# Altium PCB 新执行器202608.PcbDoc (part 1 of 2)
Units mm, origin at the board's own origin, x right, y up, seen from the top; angles counter-clockwise.
Board outline 67.11 x 92.2 mm, 2 copper layers (Top Layer, Bottom Layer); 111 components, 81 nets, 454 pads, 489 vias.
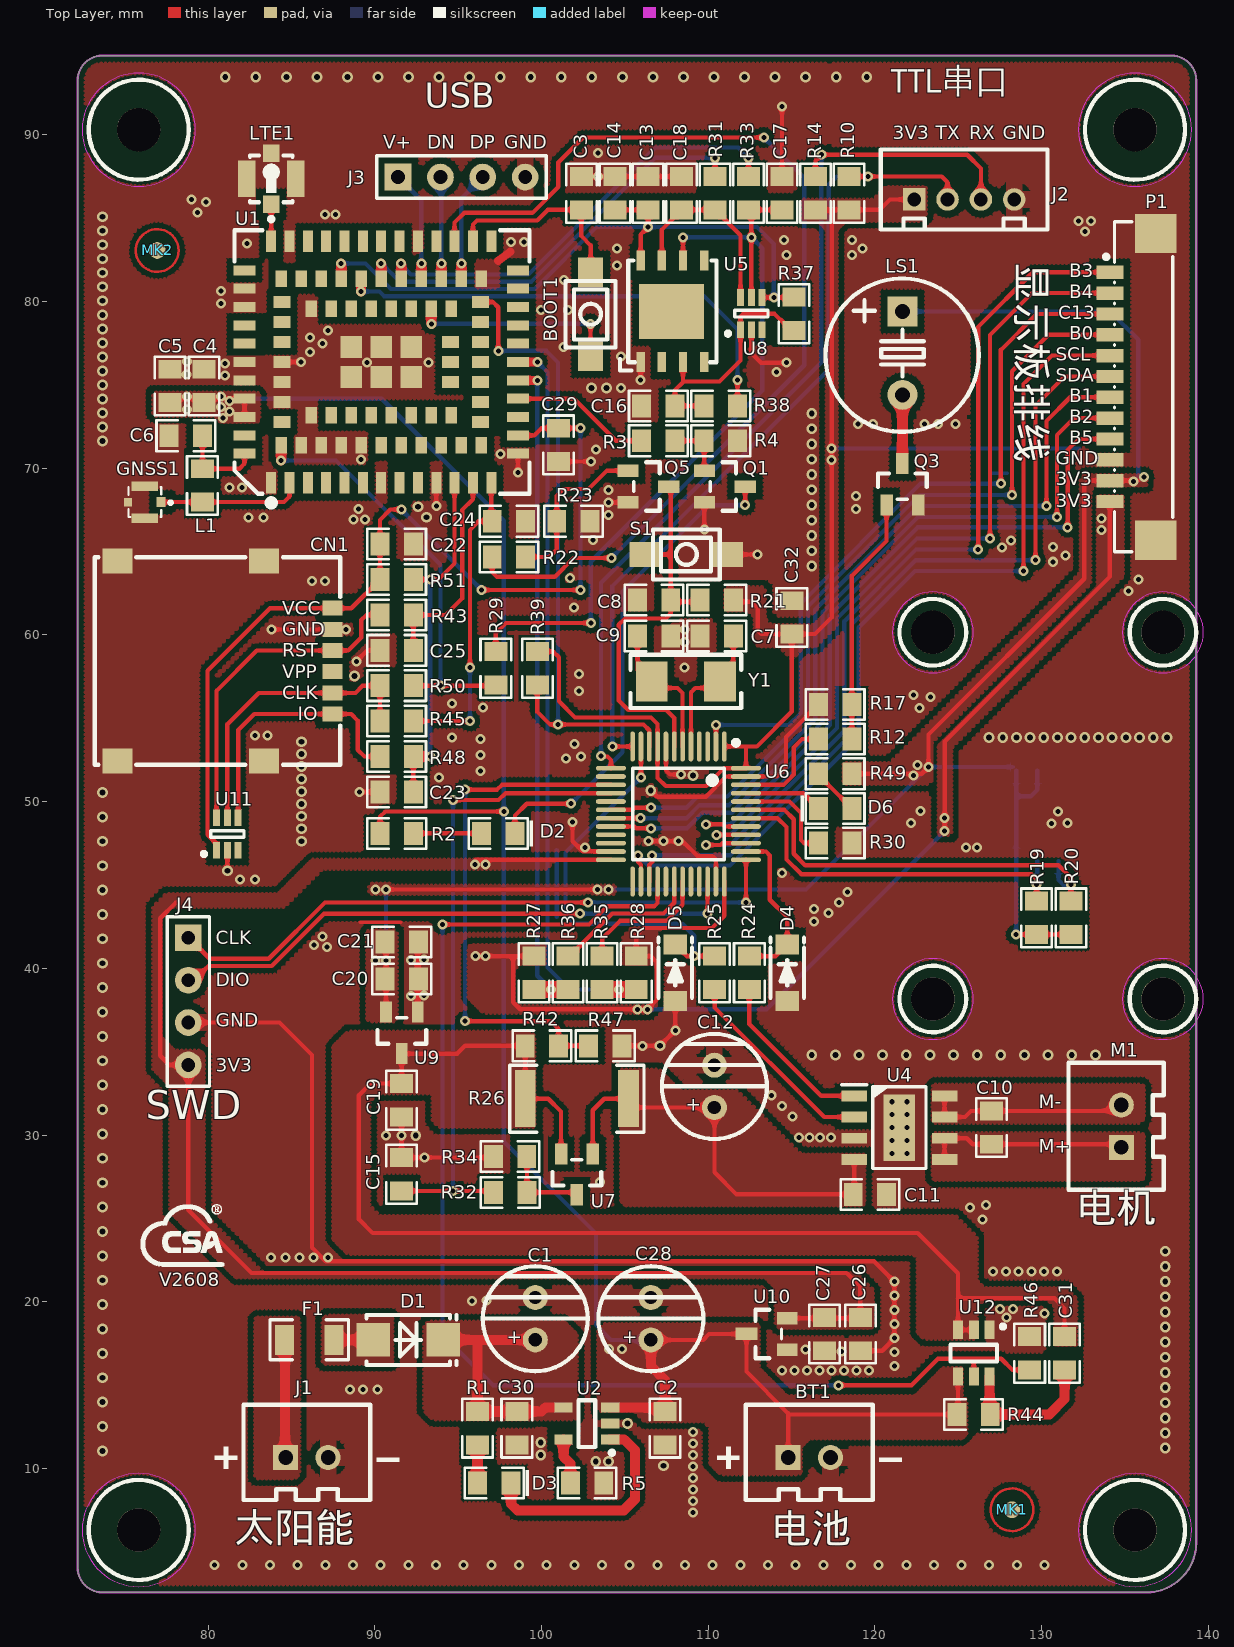
[diagram p0: Top Layer view]
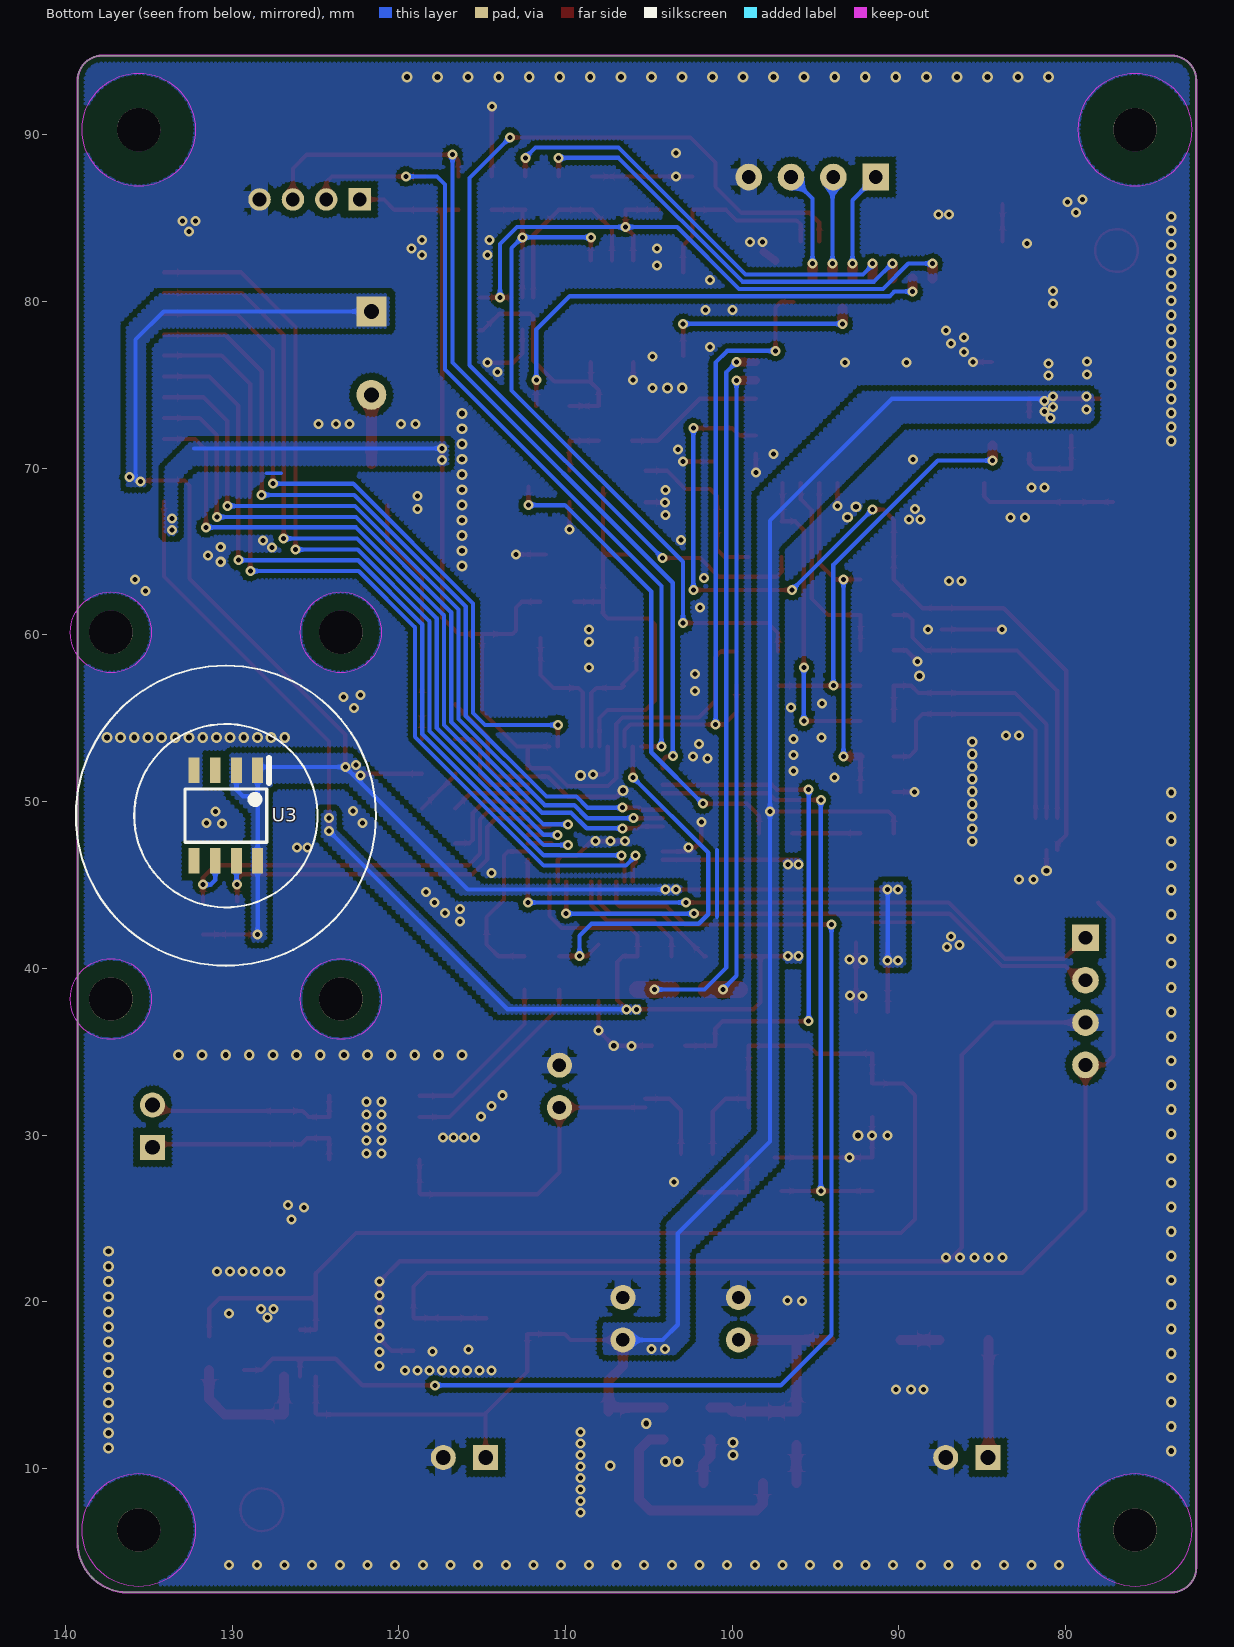
[diagram p1: Bottom Layer view, seen from below]

## Layer stack, top to bottom
Top Layer: signal copper 0.0356
Dielectric: dielectric 0.32, FR-4, Dk 4.8
Bottom Layer: signal copper 0.0356

## Board outline
72.163,4.057 ccw(c73.663,4.057) 73.663,2.557 136.275,2.557 ccw(c136.275,5.557) 139.275,5.557 139.275,93.257 ccw(c137.775,93.257) 137.775,94.757 73.663,94.757 ccw(c73.663,93.257) 72.163,93.257

## Design rules (kind name [scope] priority, off if disabled: settings)
Clearance Clearance_1 [IsPad] p1: gap=0.18
Clearance [All] p2: gap=0.18
HoleSize [All] p1: absolutevalues=TRUE maxlimit=10 minlimit=0.025 maxpercent=80.000 minpercent=20.000
HoleToHoleClearance [All] p1: gap=0 allowstackedmicrovias=TRUE
MinimumSolderMaskSliver [All] p1: minsoldermaskwidth=0
PolygonConnect PolygonConnect_2 [IsSMTPin] p1: connectstyle=Direct reliefconductorwidth=0.254 reliefentries=4 polygonreliefangle="90 Angle"
PolygonConnect PolygonConnect_1 [IsVia] p2: connectstyle=Direct reliefconductorwidth=0.254 reliefentries=4 polygonreliefangle="90 Angle"
PolygonConnect [All] p3: connectstyle=Relief reliefconductorwidth=1 reliefentries=4 polygonreliefangle="90 Angle"
RoutingVias [All] p1: holewidth=0.711 width=1.27 viastyle="Through Hole" minholewidth=0.711 minwidth=1.27 maxholewidth=0.711 maxwidth=1.27
SilkToSilkClearance [All] p1: silktosilkclearance=0
SilkscreenOverComponentPads [IsPad] p1: minsilkscreentomaskgap=0
SolderMaskExpansion [All] p1: expansion=0.102
Width [All] p1: maxlimit=10 minlimit=0.1 preferedwidth=0.254 checkconnectedcopper=TRUE
23 further rules are at their usual default settings.

## Components (designator, comment, footprint, x,y, rotation, side; value= is the part's Value field where it differs from the comment)
BOOT1 "3*4MM轻触开关" 3*4MM轻触开关 102.944,79.233 r270 top
BT1 "XH2.54-2PIN直" XH2.54-2PINֱ 116.063,10.65 r0 top
C1 "100uF/35V" 6*7插件 99.625,18.98 r90 top
C2 "104" 0805-C 107.408,12.414 r90 top
C3 "1uF" 0805-C 102.387,86.499 r270 top
C4 "22uF" 0805-C 79.755,74.935 r270 top
C5 "33pF" 0805-C 77.709,74.935 r270 top
C6 "104" 0805-C 78.662,71.947 r180 top
C7 "22pF" 0805-C 110.505,59.939 r0 top
C8 "104" 0805-C 106.748,62.104 r0 top
C9 "22pF" 0805-C 106.748,59.939 r180 top
C10 "104" 0805-C 127.002,30.448 r90 top
C11 "104" 0805-C 119.695,26.44 r180 top
C12 "100uF/35V" 6*7插件 110.367,32.917 r90 top
C13 "104" 0805-C 106.398,86.499 r90 top
C14 "33pF" 0805-C 104.392,86.499 r90 top
C15 "104" 0805-C 91.606,27.645 r90 top
C16 "33pF" 0805-C 107.006,73.735 r0 top
C17 "33pF" 0805-C 114.421,86.499 r270 top
C18 "33pF" 0805-C 108.404,86.499 r270 top
C19 "104" 0805-C 91.606,32.083 r270 top
C20 "22uF" 0805-C 91.615,39.361 r0 top
C21 "104" 0805-C 91.615,41.584 r0 top
C22 "104" 0805-C 91.308,65.448 r0 top
C23 "33pF" 0805-C 91.308,50.583 r0 top
C24 "33pF" 0805-C 98.041,66.818 r180 top
C25 "33pF" 0805-C 91.308,59.077 r0 top
C26 "104" 0805-C 119.123,18.058 r90 top
C27 "22uF" 0805-C 116.964,18.058 r90 top
C28 "100uF/35V" 6*7插件 106.558,18.98 r90 top
C29 "104" 0805-C 101.011,71.401 r90 top
C30 "104" 0805-C 98.513,12.414 r90 top
C31 "NC" 0805-C 131.377,16.911 r90 top
C32 "104" 0805-C 115.01,61.05 r270 top
CN1 "NanoSIM卡翻盖式" NanoSIM卡翻盖式 81.004,58.427 r270 top
D1 "SS34" "SMA - JW" 92.004,17.71 r180 top
D2 "红" 0805-LED 97.399,48.096 r180 top
D3 "红" 0805-LED 97.167,9.125 r180 top
D4 "SMF3.3CA" SOD-123 114.737,39.73 r270 top
D5 "SMF3.3CA" SOD-123 108.022,39.73 r270 top
D6 "红" 0805-LED 117.612,49.59 r0 top
F1 "1A 9V" 1206-R 86.064,17.71 r0 top
GNSS1 "IPEX4" IPEX4 76.177,67.965 r90 top
J1 "XH2.54-2PIN直" XH2.54-2PINֱ 85.924,10.65 r0 top
J2 "PH2.0-4PIN" PH2.0-4PIN 125.354,86.121 r0 top
J3 "2.54单排针" 2.54-4PIN 95.203,87.466 r0 top
J4 "2.54单排针" 2.54-4PIN 78.808,38.015 r270 top
L1 "47nH" 0805-R 79.647,68.965 r90 top
LS1 "蜂鸣器0905(3.3V)" 蜂鸣器0905 121.652,76.905 r270 top
LTE1 "IPEX1" IPEX天线底座 83.783,87.358 r0 top
M1 "XH2.54-2PIN直" XH2.54-2PINֱ 134.781,30.532 r90 top
MK1 "make" make点 128.218,7.521 r0 top
MK2 "make" make点 76.945,83.061 r0 top
P1 "1.25-SMD-12PIN立贴" 1.25-SMD-12PIN立贴 135.472,74.88 r270 top
Q1 "S8050" SOT--23#1 110.99,68.903 r180 top
Q3 "S8050" SOT--23#2 121.646,69.034 r270 top
Q5 "S8050" SOT--23#1 106.414,68.903 r180 top
R1 "1K" 0805-R 96.158,12.414 r90 top
R2 "1K" 0805-R 91.317,48.096 r0 top
R3 "1K" 0805-R 107.006,71.648 r180 top
R4 "10K" 0805-R 110.755,71.648 r180 top
R5 "2K" 0805-R 102.728,9.125 r180 top
R10 "100K" 0805-R 118.433,86.499 r90 top
R12 "1K" 0805-R 117.612,53.753 r180 top
R14 "100K" 0805-R 116.427,86.499 r90 top
R17 "10K" 0805-R 117.612,55.835 r0 top
R19 "10K" 0805-R 129.696,43.027 r90 top
R20 "10K" 0805-R 131.755,43.027 r90 top
R21 "10K" 0805-R 110.505,62.104 r0 top
R22 "1K" 0805-R 98.041,64.677 r0 top
R23 "10K" 0805-R 101.912,66.818 r0 top
R24 "200R" 0805-R 112.461,39.73 r90 top
R25 "200R" 0805-R 110.383,39.73 r90 top
R26 "0.05R" 2512-R 102.119,32.179 r0 top
R27 "100K" 0805-R 99.548,39.73 r90 top
R28 "100K" 0805-R 105.68,39.73 r90 top
R29 "10K" 0805-R 97.255,58.005 r270 top
R30 "10K" 0805-R 117.612,47.508 r180 top
R31 "22R" 0805-R 110.41,86.499 r270 top
R32 "22R" 0805-R 98.122,26.56 r0 top
R33 "22R" 0805-R 112.416,86.499 r270 top
R34 "2K" 0805-R 98.11,28.721 r0 top
R35 "22R" 0805-R 103.636,39.73 r270 top
R36 "22R" 0805-R 101.592,39.73 r270 top
R37 "10K" 0805-R 115.145,79.27 r90 top
R38 "22R" 0805-R 110.755,73.735 r180 top
R39 "100K" 0805-R 99.747,58.005 r90 top
R42 "10K" 0805-R 100.022,35.352 r0 top
R43 "22R" 0805-R 91.308,61.201 r0 top
R44 "300K" 0805-R 125.913,13.236 r0 top
R45 "22R" 0805-R 91.308,54.83 r0 top
R46 "300K" 0805-R 129.283,16.911 r270 top
R47 "10K" 0805-R 103.819,35.352 r180 top
R48 "22R" 0805-R 91.308,52.706 r0 top
R49 "10K" 0805-R 117.612,51.671 r0 top
R50 "10K" 0805-R 91.308,56.953 r180 top
R51 "10K" 0805-R 91.308,63.324 r180 top
S1 "3*4MM轻触开关" 3*4MM轻触开关 108.684,64.825 r180 top
U1 "Air780EPM" AIR780EP 90.383,76.37 r90 top locked
U2 "TP4055" LC-SOT-23-5 102.717,12.69 r0 top
U3 "AS5600" SOP-8 130.375,49.157 r0 bottom locked
U4 "RZ7899" SOP-8带散热 121.465,30.444 r270 top
U5 "ESIM" esim卡 107.85,79.407 r180 top
U6 "APM32F072CBT6" LC-LQFP-48_7x7x05P 108.211,49.256 r180 top locked
U7 "ZXCT1009F" SOT--23#1 102.119,27.645 r90 top
U8 "SMF05" LC-SC-70-6(SOT-363) 112.586,79.276 r270 top
U9 "XC6206P332MR" SOT--23#3 91.621,36.13 r90 top
U10 "XC6206P332MR" SOT--23#1 113.515,18.064 r0 top
U11 "SMF05" LC-SC-70-6(SOT-363) 81.151,48.06 r270 top
U12 "TPS27081" LC-SOT-23-6 125.928,16.911 r90 top (schematic designator Y12)
Y1 "8Mhz" SMD-5032_2P 108.658,57.209 r0 top

## Footprints (in the part's own frame and the unit in brackets; to place one, negate y for a bottom-side part, rotate by r counter-clockwise, add the part's x,y. Pads: shape width x height; smd on the part's side, far side on the other; paste and mask are expansions set on the pad)
1.25-SMD-12PIN立贴 [mm]
  rect 0.8x1.62 smd: 1(-6.875,-1.38) 2(-5.625,-1.38) 3(-4.375,-1.38) 4(-3.125,-1.38) 5(-1.875,-1.38) 6(-0.625,-1.38) 7(0.625,-1.38) 8(1.875,-1.38) 9(3.125,-1.38) 10(4.375,-1.38) 11(5.625,-1.38) 12(6.875,-1.38)
  rect 2.35x2.5 smd: 10(-9.2,1.38) 10(9.2,1.38)
  silkscreen extent -9.9,-1.73 9.9,2.4
2.54-4PIN [mm]
  rect 1.6x1.6 hole 0.82: 1(-3.81,0)
  round 1.6 hole 0.82: 2(-1.27,0) 3(1.27,0) 4(3.81,0)
  silkscreen extent -5.08,-1.27 5.08,1.27, body extent -5.08,-1.27 5.08,1.27, height 8.5
3*4MM轻触开关 [mm]
  rect 1.8x1.5 smd: 1(-2.5,0.001) 2(2.5,-0.001)
  silkscreen extent -2.01,-1.5 1.99,1.5
6*7插件 [mm] "电解电容"
  round 1.5 hole 0.8: 1(-1.27,0) 2(1.27,0)
  silkscreen extent -3.15,-3.15 3.15,3.15
0805-C [mm] "0805贴片电容"
  rect 1.133x1.377 smd: 1(-1,0) 2(1,0)
  silkscreen extent -1.76,-0.92 1.76,0.92
0805-LED [mm] "0805LED"
  rect 1.133x1.377 smd: 1(1,0) 2(-1,0)
  silkscreen extent -2.09,-0.92 1.76,0.92
0805-R [mm] "0805电阻"
  rect 1.133x1.377 smd: 1(-1,0) 2(1,0)
  silkscreen extent -1.76,-0.92 1.76,0.92
1206-R [mm] "1206贴片电阻"
  rect 1.13x1.8 smd: 1(-1.49,0) 2(1.49,0)
  silkscreen extent -2.36,-1.2 2.35,1.2, body extent -1.7,-0.86 1.65,0.87, height 0.85
2512-R [mm] "2512-R"
  rect 1.25x3.42 smd: 1(-3.1,0) 2(3.1,0)
  silkscreen extent -4.03,-2.01 4.02,2.01, body extent -3.16,-1.6 3.16,1.6, height 0.62
AIR780EP [mm]
  rect 1.3x0.6 smd mask+0.102: 1(-7.25,6.6) 2(-7.25,5.5) 3(-7.25,4.4) 4(-7.25,3.3) 5(-7.25,2.2) 6(-7.25,1.1) 7(-7.25,0) 8(-7.25,-1.1) 9(-7.25,-2.2) 10(-7.25,-3.3) 11(-7.25,-4.4) 12(-7.25,-5.5) 13(-7.25,-6.6) 23(7.25,-6.6) 24(7.25,-5.5) 25(7.25,-4.4) 26(7.25,-3.3) 27(7.25,-2.2) 28(7.25,-1.1) 29(7.25,0) 30(7.25,1.1) 31(7.25,2.2) 32(7.25,3.3) 33(7.25,4.4) 34(7.25,5.5) 35(7.25,6.6)
  rect 0.6x1.3 smd mask+0.102: 14(-4.4,-8.2) 15(-3.3,-8.2) 16(-2.2,-8.2) 17(-1.1,-8.2) 18(0,-8.2) 19(1.1,-8.2) 20(2.2,-8.2) 21(3.3,-8.2) 22(4.4,-8.2) 36(4.4,8.2) 37(3.3,8.2) 38(2.2,8.2) 39(1.1,8.2) 40(0,8.2) 41(-1.1,8.2) 42(-2.2,8.2) 43(-3.3,8.2) 44(-4.4,8.2) 95(-5.5,-8.2) 96(5.5,-8.2) 97(5.5,8.2) 98(-5.5,8.2)
  rect 1x0.7 smd mask+0.102: 45(-5,4.8) 46(-5,3.6) 47(-5,2.4) 48(-5,1.2) 49(-5,0) 50(-5,-1.2) 51(-5,-2.4) 52(-5,-3.6) 53(-5,-4.8) 59(5,-4.8) 60(5,-3.6) 61(5,-2.4) 62(5,-1.2) 63(5,0) 64(5,1.2) 65(5,2.4) 66(5,3.6) 67(5,4.8) 73(-3.2,4.2) 74(-3.2,3) 75(-3.2,1.8) 76(-3.2,0.6) 77(-3.2,-0.6) 78(-3.2,-1.8) 79(-3.2,-3) 80(-3.2,-4.2) 81(3.2,-4.2) 82(3.2,-3) 83(3.2,-1.8) 84(3.2,-0.6) 85(3.2,0.6) 86(3.2,1.8) 87(3.2,3) 88(3.2,4.2) 99(-5,6) 100(-5,-6) 103(5,-6) 104(5,6)
  rect 0.7x1 smd mask+0.102: 54(-2.4,-5.95) 55(-1.2,-5.95) 56(0,-5.95) 57(1.2,-5.95) 58(2.4,-5.95) 68(2.4,5.95) 69(1.2,5.95) 70(0,5.95) 71(-1.2,5.95) 72(-2.4,5.95) 101(-3.6,-5.95) 102(3.6,-5.95) 105(3.6,5.95) 106(-3.6,5.95) 107(-1.2,-4.15) 108(0,-4.15) 109(1.2,-4.15)
  rect 1.3x1.3 smd mask+0.102: 89(-0.9,1.8) 90(-0.9,0) 91(-0.9,-1.8) 92(0.9,-1.8) 93(0.9,0) 94(0.9,1.8)
  silkscreen extent -8.65,-8.9 7.9,8.8
esim卡 [mm] "5*6"
  rect 3.9x3.3 smd: 0(0.05,0)
  rect 0.5x1.2 smd: 1(1.905,3.05) 2(0.635,3.05) 3(-0.635,3.05) 4(-1.905,3.05) 5(-1.905,-3.05) 6(-0.635,-3.05) 7(0.635,-3.05) 8(1.905,-3.05)
  silkscreen extent -2.65,-3.05 3.15,3.55
IPEX4 [mm]
  rect 0.6x0.55 smd: 1(0.001,-0.987)
  rect 0.58x1.58 smd: 2(-0.96,-0.012) 2(0.96,-0.012)
  rect 0.5x0.5 smd: 2(0.001,0.987)
  silkscreen extent -0.9,-1.67 0.9,0.95
IPEX天线底座 [mm] "U.FL-R-SMT-1(10)"
  rect 1x1.05 smd mask+0.051: 1(0,-1.525) 2(0,1.525)
  rect 1.05x2.2 smd mask+0.051: 2(-1.475,0) 2(1.475,0)
  silkscreen extent -1.27,-2.54 1.27,1.4
LC-LQFP-48_7x7x05P [mm]
  oval 0.28x1.8 smd mask+0.051: 1(-2.75,-4.05) 2(-2.25,-4.05) 3(-1.75,-4.05) 4(-1.25,-4.05) 5(-0.75,-4.05) 6(-0.25,-4.05) 7(0.25,-4.05) 8(0.75,-4.05) 9(1.25,-4.05) 10(1.75,-4.05) 11(2.25,-4.05) 12(2.75,-4.05) 25(2.75,4.05) 26(2.25,4.05) 27(1.75,4.05) 28(1.25,4.05) 29(0.75,4.05) 30(0.25,4.05) 31(-0.25,4.05) 32(-0.75,4.05) 33(-1.25,4.05) 34(-1.75,4.05) 35(-2.25,4.05) 36(-2.75,4.05)
  oval 1.8x0.28 smd mask+0.051: 13(4.05,-2.75) 14(4.05,-2.25) 15(4.05,-1.75) 16(4.05,-1.25) 17(4.05,-0.75) 18(4.05,-0.25) 19(4.05,0.25) 20(4.05,0.75) 21(4.05,1.25) 22(4.05,1.75) 23(4.05,2.25) 24(4.05,2.75) 37(-4.05,2.75) 38(-4.05,2.25) 39(-4.05,1.75) 40(-4.05,1.25) 41(-4.05,0.75) 42(-4.05,0.25) 43(-4.05,-0.25) 44(-4.05,-0.75) 45(-4.05,-1.25) 46(-4.05,-1.75) 47(-4.05,-2.25) 48(-4.05,-2.75)
  silkscreen extent -3.6,-4.42 2.75,2.75
LC-SC-70-6(SOT-363) [mm]
  rect 1x0.42 smd mask+0.051: 1(0.97,-0.65) 2(0.97,0) 3(0.97,0.65) 4(-0.97,0.65) 5(-0.97,0) 6(-0.97,-0.65)
  silkscreen extent -0.2,-1.52 1.32,1, body extent -1.2,-1.1 1.2,1.1, height 1.1
LC-SOT-23-5 [mm]
  rect 1.1x0.6 smd: 1(1.4,-0.95) 2(1.4,0) 3(1.4,0.95) 4(-1.4,0.95) 5(-1.4,-0.95)
  silkscreen extent -0.5,-1.87 1.63,1.4
LC-SOT-23-6 [mm]
  rect 1.1x0.6 smd: 1(1.4,-0.95) 2(1.4,0) 3(1.4,0.95) 4(-1.4,0.95) 5(-1.4,0) 6(-1.4,-0.95)
  silkscreen extent -0.5,-1.87 1.72,1.4
make点 [mm] "识别效果很好"
  round 1 smd: 1(0,0)
  round 2.032 on Top Solder: ""(0,0)
  Top Layer circle w0.152: c0,0 r1.28
NanoSIM卡翻盖式 [mm] "C720512"
  rect 0.9x1.2 smd paste+0 mask+0.051: 1(-3.175,6.45) 2(-1.905,6.45) 3(-0.635,6.45) 4(0.635,6.45) 5(1.905,6.45) 6(3.175,6.45)
  rect 1.5x1.8 smd paste+0 mask+0.051: 2(-6,2.35) 2(-6,-6.45) 2(6,2.35) 2(6,-6.45)
  silkscreen extent -6.23,-7.81 6.21,6.92
PH2.0-4PIN [mm]
  rect 1.35x1.35 hole 0.82: 1(-3,0)
  round 1.35 hole 0.82: 2(-1,0) 3(1,0) 4(3,0)
  silkscreen extent -5,-1.8 5,3
"SMA - JW" [mm]
  rect 2x2 smd: 1(2.1,0) 2(-2.1,0)
  silkscreen extent -2.89,-1.5 2.5,1.5, body extent -2.55,-1.33 2.55,1.33, height 2.29
SMD-5032_2P [mm]
  rect 1.9x2.4 smd: 1(-2.05,0) 2(2.05,0)
  silkscreen extent -3.32,-1.6 3.33,1.6, body extent -2.51,-1.58 2.55,1.62, height 1.5
SOD-123 [mm] "1N4148"
  rect 1.2x1.4 smd paste+0 mask+0.051: 1(1.7,0) 2(-1.7,0)
  silkscreen extent -2.11,-1 1.5,1, body extent -1.83,-0.79 1.87,0.81, height 1.35
SOP-8 [mm]
  rect 0.65x1.525 smd: 1(-1.905,-2.712) 2(-0.635,-2.712) 3(0.635,-2.712) 4(1.905,-2.712) 5(1.905,2.712) 6(0.635,2.712) 7(-0.635,2.712) 8(-1.905,2.712)
  silkscreen extent -2.58,-3.47 2.45,1.6, body extent -2.45,-3 2.45,3, height 1.75
SOP-8带散热 [mm] "SOP-8带散热"
  rect 0.65x1.525 smd: 1(-1.905,-2.712) 2(-0.635,-2.712) 3(0.635,-2.712) 4(1.905,-2.712) 5(1.905,2.712) 6(0.635,2.712) 7(-0.635,2.712) 8(-1.905,2.712)
  rect 4x1.9 smd: 3(0,0)
  silkscreen extent -2.58,-3.47 2.45,1.6, body extent -2.45,-3 2.45,3, height 1.75
SOT--23#1 [mm]
  rect 1.25x0.75 smd: 1(1.225,-0.95) 2(1.225,0.95)
  rect 1.3x0.75 smd: 3(-1.225,0)
  silkscreen extent -0.67,-1.46 0.88,1.46, body extent -1.52,-1.5 1.48,1.5, height 1.3
SOT--23#2 [mm]
  rect 1.25x0.75 smd: 1(1.25,-0.95) 2(1.25,0.95) 3(-1.25,0)
  silkscreen extent -0.65,-1.46 0.9,1.46, body extent -1.5,-1.5 1.5,1.5, height 1.3
SOT--23#3 [mm]
  rect 1.25x0.7 smd: 1(1.25,-0.95) 2(1.25,0.95) 3(-1.25,0)
  silkscreen extent -0.65,-1.46 0.9,1.46, body extent -1.5,-1.5 1.5,1.5, height 1.3
XH2.54-2PINֱ [mm]
  rect 1.5x1.5 hole 0.88: 1(-1.27,0)
  round 1.5 hole 0.88: 2(1.27,0)
  silkscreen extent -3.81,-2.55 3.8,3.18, body extent -3.77,-2.4 3.77,3.3, height 7.05
蜂鸣器0905 [mm]
  rect 1.8x1.8 hole 0.9: 1(-2.5,0)
  round 1.8 hole 0.9: 2(2.5,0)
  silkscreen extent -4.47,-4.62 4.72,4.58, body extent -4.5,-4.5 4.5,4.5, height 5.45

## Part data
BOOT1 S1: library part SW-PB, "Switch"
BT1: library part Battery, "Multicell Battery"
C1 C12 C28: library part "Cap Pol2", "Polarized Capacitor (Axial)"
C2 C3 C4 C5 C6 C7 C8 C9 C10 C19 C20 C21 C26 C27 C30 C31 C32: library part Cap, "Capacitor"
C11 C15: library part CAP, "Capacitor"
C13 C14 C16 C17 C18 C22 C23 C24 C25 C29: library part "Cap Semi", "Capacitor (Semiconductor SIM Model)"
CN1: library part SIM_CARD, "SIM CARD"
D1: library part "Diode 1N4001", "1 Amp General Purpose Rectifier"
D2 D3 D6: library part LED0, "Typical INFRARED GaAs LED"
D4 D5: library part TVS, "TVS"
F1: library part "Fuse 1", "Fuse"
GNSS1 LTE1: library part SMB, "SMB Straight Connector"
J1: library part "Header 2", "Header, 2-Pin"
J2 J3 J4: library part "Header 4", "Header, 4-Pin"
L1: library part Inductor, "Inductor"
LS1: library part Bell, "Electrical Bell"
M1: library part Motor, "Motor, General Kind"
P1: library part "Header 12", "Header, 12-Pin"
Q1 Q3 Q5: library part 2N3904, "NPN General Purpose Amplifier"
R1 R2 R3 R4 R5 R10 R12 R14 R17 R19 R20 R21 R22 R23 R24 R25 R26 R27 R28 R29 R30 R31 R32 R33 R34 R35 R36 R37 R38 R39 R42 R43 R44 R45 R46 R47 R48 R49 R50 R51: library part Res2, "Resistor"
U1: library part AIR780EP
U4: library part SA8337, "SA8337"
U8 U11: library part SMF05CT, "SMF05CT1G"
U9 U10: library part "Volt Reg", "Voltage Regulator"
Y1: library part XTAL, "Crystal Oscillator"

## Free pads (board coordinates)
  round 2.6 hole 2.6: 0(75.834,6.308) 0(75.834,90.308) 0(123.475,38.157) 0(123.475,60.157) 0(135.603,6.308) 0(135.603,90.308) 0(137.275,38.157) 0(137.275,60.157)

## Via types
v1: diameter 0.6, hole 0.3, Top Layer to Bottom Layer, tented both sides, 330 vias
v2: diameter 0.65, hole 0.35, Top Layer to Bottom Layer, tented both sides, 147 vias
v3: diameter 0.6, hole 0.3, Top Layer to Bottom Layer, 12 vias

## Nets (pads, with @x,y where several pads share a name; then routed paths per layer and width w, separated by ;. In a path a pad name is that pad's centre, name@x,y a point inside that pad or via, vN(x,y) a via of type N, cw(c..) or ccw(c..) an arc to the next point about the centre after c; other vN are vias at no path point)
+3.3V: C20.1 C21.1 LS1.1 P1.11 R19.1 R20.1 R49.2 U3.1 U3.2 U3.8 U9.2 | length 116.9
  Top Layer w0.254: U9.2@90.671,37.38 v1(90.671,40.472) C21.1@90.671,41.528 ; v1(90.671,44.732) v1(103.361,44.732) ; R49.2@118.612,51.671 122.806,51.671 v1(123.214,52.079) 123.214,54.024 132.557,63.367 132.557,68.955 132.857,69.255 P1.11@134.092,69.255 v1@135.797,69.255 ; v1(128.47,42.027) R20.1@131.755,42.027
  Bottom Layer w0.254: v1(90.671,40.472) v1(90.671,44.732) ; v1(103.361,44.732) 115.867,44.732 v1(123.214,52.079) U3.1@128.26,52.079 ; LS1.1@121.652,79.405 134.104,79.405 135.797,77.712 v1@135.797,69.255 ; v1(128.47,42.027) U3.8@128.47,46.445 128.47,50.322 ; U3.1@128.47,51.869 128.47,50.322 ; U3.2@129.74,51.869 129.74,50.712 129.35,50.322 128.47,50.322
  other v1: 90.043,40.472 90.043,44.732 104.013,44.732 122.301,51.562 122.555,52.197 135.509,69.215 136.144,69.469
+3.3V1: C26.2 C27.2 C32.2 J2.1 J4.4 P1.12 R10.1 R14.1 R21.2 R27.2 R28.2 R39.2 U6.1 U6.9 U6.24 U6.36 U6.48 U10.2 | length 236.5
  Top Layer w0.254: 78.043,43.927 77.123,43.007 77.123,34.751 77.669,34.205 J4.4@78.808,34.205 78.808,25.51 82.601,21.717 118.309,21.717 119.123,20.903 C26.2@119.123,19.058 119.123,20.704 ; v1(96.038,40.73) 98.299,40.73 ; v1@96.038,46.506 U6.24@104.161,46.506 ; R27.2@99.548,40.73 98.299,40.73 ; R39.2@99.747,59.005 100.695,59.005 101.04,58.66 101.04,56.023 102.01,55.053 106.572,55.053 106.961,54.664 U6.9@106.961,53.306 106.961,51.419 107.45,50.93 109.879,50.93 110.955,52.006 U6.48@112.261,52.006 112.261,53.269 ; U6.36@110.961,45.206 110.961,43.147 110.228,42.414 106.123,42.414 105.68,41.971 R28.2@105.68,40.73 106.557,40.73 106.901,40.386 106.901,38.094 v1(106.347,37.54) 98.72,37.54 98.299,37.961 98.299,40.73 ; U6.1@110.961,53.306 112.914,53.306 115.01,55.402 C32.2@115.01,60.05 ; R21.2@111.505,61.985 112.625,61.985 112.968,61.642 112.968,60.255 113.173,60.05 C32.2@115.01,60.05 ; U10.2@114.74,19.014 C26.2@119.079,19.014 ; R14.1@116.427,85.499 117.401,85.499 ; J2.1@122.354,86.121 120.897,86.121 120.275,85.499 R10.1@118.433,85.499 117.401,85.499 ; v1(124.184,48.236) 124.184,53.603 134.092,63.511 134.092,66.921 P1.12@134.092,68.005 ; C32.2@115.01,60.05 116.406,60.05 117.401,61.045 v1(117.401,71.19) 117.401,85.499
  Bottom Layer w0.254: v1(106.347,37.54) 113.488,37.54 v1(124.184,48.236) ; v1(117.401,71.19) 132.269,71.19
  other v1: 105.756,37.54 96.644,40.73 96.017,46.23 96.642,46.23 124.184,49.022 133.604,66.294 133.604,66.98 117.401,70.485
+4.2V: C19.1 C31.2 R26.1 R42.1 U7.2 U9.3 U12.2 U12.3 | length 78.9
  Top Layer w0.254: U9.3@91.606,34.88 C19.1@91.606,33.083 89.734,33.083 89.038,32.387 89.038,24.945 89.868,24.115 122.567,24.115 124.978,21.704 124.978,20.21 ; U9.3@91.621,34.88 94.946,34.88 95.418,35.352 96.201,35.352 ; 95.649,35.352 96.201,35.352 ; R26.1@99.019,31.651 R42.1@99.019,35.349 ; R26.1@99.019,32.179 100.403,32.179 101.169,31.413 U7.2@101.169,28.87 ; R42.1@99.022,35.352 96.201,35.352 ; U12.2@125.928,18.311 U12.3@124.978,18.311 124.978,20.21 ; C31.2@131.377,17.911 131.377,19.596 130.763,20.21 124.978,20.21
A2_\FLOW_TX: J2.2 R10.2 U6.12 | length 49.9
  Top Layer w0.254: v1(104.247,53.306) U6.12@105.461,53.306 ; R10.2@118.433,87.499 v1(119.57,87.499) 124.01,87.499 124.354,87.155 J2.2@124.354,86.121
  Bottom Layer w0.254: v1(104.247,53.306) 104.247,62.931 117.231,75.915 117.231,87.018 117.712,87.499 v1(119.57,87.499)
A3_FLOW_RX: J2.3 R14.2 U6.13 | length 56
  Top Layer w0.254: v1(103.566,52.724) 103.591,52.699 103.96,52.699 104.161,52.498 U6.13@104.161,52.006 ; R14.2@116.427,87.499 116.427,88.451 v1(116.782,88.806) 125.534,88.806 126.354,87.986 J2.3@126.354,86.121
  Bottom Layer w0.254: v1(103.566,52.724) 103.566,63.133 116.782,76.349 v1(116.782,88.806)
AGPIOWU0-PA0: R39.1 U1.102 U6.10 | length 39.2
  Top Layer w0.254: U1.102@96.333,79.97 97.091,79.97 97.403,79.658 v1(97.403,77.04) ; R39.1@99.747,57.005 99.747,55.376 100.501,54.622 v1(100.994,54.622) 100.997,54.619 106.121,54.619 106.461,54.279 U6.10@106.461,53.306
  Bottom Layer w0.254: v1@97.377,77.04 v1(97.403,77.04) 100.295,77.04 100.994,76.341 v1(100.994,54.622)
B3_KEY: P1.1 U6.39 | length 52.6
  Top Layer w0.254: v1@109.853,47.472 109.926,47.399 110.746,47.399 110.853,47.506 U6.39@112.261,47.506 ; v1(126.192,65.116) 126.192,78.479 129.468,81.755 P1.1@134.092,81.755
  Bottom Layer w0.254: v1(109.853,47.399) 111.313,47.399 118.158,54.244 118.158,60.813 122.461,65.116 v1(126.192,65.116)
B4_KEY: P1.2 U6.40 | length 49.8
  Top Layer w0.254: v1(110.495,48.006) U6.40@112.261,48.006 ; v1(126.906,65.784) 126.906,77.993 129.418,80.505 P1.2@134.092,80.505
  Bottom Layer w0.254: v1(110.495,48.006) 111.306,48.006 117.724,54.423 117.724,60.993 122.515,65.784 v1(126.906,65.784)
B13_SCL: P1.5 U6.26 | length 53.3
  Top Layer w0.254: v1(105.788,46.776) 105.788,46.383 105.961,46.21 U6.26@105.961,45.206 ; v1@128.91,63.819 128.91,75.045 130.62,76.755 P1.5@134.092,76.755
  Bottom Layer w0.254: v1(105.788,46.776) 105.788,46.764 106.383,46.169 111.311,46.169 119.026,53.884 119.026,60.454 122.403,63.831 v1(128.91,63.831)
B14_SDA: P1.6 U6.27 | length 50.3
  Top Layer w0.254: U6.27@106.461,45.206 106.461,46.2 106.634,46.373 v1(106.634,46.776) ; v1(129.63,64.48) 129.63,73.758 131.377,75.505 P1.6@134.092,75.505
  Bottom Layer w0.254: v1(106.634,46.776) 111.304,46.776 118.592,54.064 118.592,60.634 122.438,64.48 v1(129.63,64.48)
B15_BAT_SW: R46.2 U6.28 U12.5 | length 77.8
  Top Layer w0.254: v1(94.052,42.629) 102.847,42.629 103.934,43.716 106.754,43.716 106.961,43.923 U6.28@106.961,45.206 ; v1(117.826,14.986) 122.192,14.986 123.787,16.581 125.928,16.581 ; U12.5@125.928,15.511 125.928,16.581 ; R46.2@129.283,15.911 128.249,15.911 127.579,16.581 125.928,16.581
  Bottom Layer w0.254: v1(94.052,42.629) 94.052,18.017 97.083,14.986 v1(117.826,14.986)
BOOT: BOOT1.2 U1.82 | length 12.4
  Top Layer w0.254: BOOT1.2@102.942,76.733 v1(102.942,78.665)
  Top Layer w0.6: v1(93.383,78.665) U1.82@93.383,79.57
  Bottom Layer w0.254: v1(93.383,78.665) v1(102.942,78.665)
BOOT0: R30.2 U6.44 | length 6.3
  Top Layer w0.254: U6.44@112.261,50.006 114.873,50.006 115.562,49.317 115.562,47.701 115.755,47.508 R30.2@116.612,47.508
C13-KEY_WAKE: P1.3 U6.2 | length 43.7
  Top Layer w0.254: U6.2@110.461,53.306 v1(110.461,54.596) ; v1(127.551,69.074) 127.551,77.1 129.706,79.255 P1.3@134.092,79.255
  Bottom Layer w0.254: v1(110.461,54.596) 114.828,54.596 115.554,55.322 115.554,61.892 122.736,69.074 v1(127.551,69.074)
GND: BT1.2 C1.2 C2.1 C3.1 C4.1 C5.1 C6.2 C7.1 C8.1 C9.1 C11.1 C12.2 C13.2 C14.2 C15.2 C16.1 C17.1 C18.1 C19.2 C20.2 C21.2 C22.2 C23.1 C24.1 C25.1 C26.1 C27.1 C28.2 C29.1 C30.1 C32.1 CN1.2 D4.1 D5.1 GNSS1.2 J1.2 J2.4 J3.4 J4.3 LTE1.2 P1.10 Q1.2 Q3.2 Q5.2 R4.1 R5.1 R17.1 R23.2 R30.1 R34.1 R46.1 R47.1 S1.1 U1.1 U1.7 U1.10 U1.27 U1.34 U1.36 U1.37 U1.40 U1.41 U1.45 U1.46 U1.47 U1.48 U1.70 U1.71 U1.72 U1.73 U1.88 U1.89 U1.90 U1.91 U1.92 U1.93 U1.94 U1.95 U1.103 U2.2 U3.4 U4.3 U5.1 U6.8 U6.23 U6.35 U6.47 U8.2 U9.1 U10.1 U11.2 U12.1 | length 145.9
  Top Layer w0.2: 89.118,42.757 91.571,42.757
  Top Layer w0.254: J4.3@78.808,36.745 84.286,36.745 86.233,34.798 86.233,23.241 87.048,22.426 119.941,22.426 v1(121.158,21.209) 121.158,17.78 120.436,17.058 C26.1@119.123,17.058 ; v2(81.151,45.849) U11.2@81.151,47.09 ; v1(83.813,60.332) CN1.2@87.454,60.332 ; U1.70@84.433,76.37 v1(85.555,76.37) ; v1(88.9,58.42) 89.557,59.077 C25.1@90.307,59.077 ; v1(89.064,50.583) C23.1@90.307,50.583 ; C19.2@91.606,31.083 C15.2@91.606,28.645 R34.1@97.466,28.645 ; U9.1@92.571,37.38 C21.2@92.571,41.54 ; v1(93.683,67.734) U1.10@93.683,69.12 ; v1(98.583,69.754) U1.95@98.583,70.87 ; C29.1@101.011,70.401 v1(102.954,70.401) ; v1(101.854,48.768) 101.854,47.625 102.473,47.006 U6.23@104.161,47.006 ; C3.1@102.387,87.499 C14.2@104.392,87.499 C13.2@106.398,87.499 C18.1@108.404,87.499 ; v1(104.021,67.953) Q5.2@105.189,67.953 ; R47.1@104.819,35.352 v2(107.107,35.352) v1(108.022,36.267) D5.1@108.022,38.03 ; v1(105.945,75.284) U5.1@105.945,76.357 ; v1(106.426,47.625) 108.458,47.625 109.347,46.736 110.236,46.736 110.461,46.511 U6.35@110.461,45.206 ; v2(106.553,50.673) 106.934,50.292 109.855,50.292 111.069,51.506 U6.47@112.261,51.506 114.108,51.506 114.661,52.059 114.661,53.884 R17.1@116.612,55.835 ; U6.8@107.461,53.306 107.461,51.875 107.714,51.622 v1(108.361,51.622) ; v1(109.765,66.331) Q1.2@109.765,67.953 ; S1.1@111.184,64.824 v1(112.957,64.824) ; U8.2@112.586,78.306 112.586,76.898 113.157,76.327 v1(114.681,76.327) ; C17.1@114.421,87.499 v1(114.421,91.688)
  Top Layer w0.5: 97.406,82.443 98.129,82.982
  Bottom Layer w0.2: 127.045,69.703 127.951,69.703
  Bottom Layer w0.254: 100.906,43.087 100.906,47.092
  other v1: 80.391,4.191 82.05,4.191 83.71,4.191 85.369,4.191 87.029,4.191 88.688,4.191 90.348,4.191 92.007,4.191 93.667,4.191 95.326,4.191 96.986,4.191 98.645,4.191 100.305,4.191 101.964,4.191 103.624,4.191 105.283,4.191 106.942,4.191 108.602,4.191 110.261,4.191 111.921,4.191 113.58,4.191 115.24,4.191 116.899,4.191 118.559,4.191 118.559,4.191 120.218,4.191 121.878,4.191 123.537,4.191 125.197,4.191 126.856,4.191 128.516,4.191 130.175,4.191 109.093,7.366 109.093,8.055 109.093,8.745 109.093,9.434 109.093,10.124 109.093,10.813 109.093,11.503 109.093,12.192 88.519,14.732 89.281,14.732 90.17,14.732 114.427,15.875 115.171,15.875 115.915,15.875 116.659,15.875 117.402,15.875 118.146,15.875 118.89,15.875 119.634,15.875 121.158,16.129 121.158,16.976 117.983,17.018 115.824,17.145 121.158,17.822 121.158,18.669 127.889,19.05 130.175,19.304 121.158,19.516 127.508,19.558 128.27,19.558 95.819,20.05 96.684,20.067 121.158,20.362 127.088,21.813 127.852,21.813 128.615,21.813 129.379,21.813 130.142,21.813 130.906,21.813 83.776,22.64 84.628,22.64 85.479,22.64 86.331,22.64 87.183,22.64 126.453,24.925 125.689,25.657 126.651,25.809 103.505,27.178 92.964,28.645 115.443,29.845 116.079,29.845 116.715,29.845 117.351,29.845 90.678,29.972 91.606,29.972 115.062,31.115 114.427,31.75 113.792,32.385 106.045,35.352 92.181,38.349 92.949,38.361 92.169,40.512 92.962,40.522 87.122,41.275 86.36,41.402 86.868,41.91 116.332,42.799 117.221,43.307 116.332,43.561 117.856,43.942 118.364,44.577 81.915,45.339 82.804,45.339 114.427,45.72 102.616,47.244 125.476,47.244 126.111,47.244 107.315,47.625 108.204,47.625 130.595,48.679 122.168,48.722 131.545,48.711 130.99,49.406 122.738,49.431 93.855,51.459 96.324,51.827 101.473,52.578 102.362,52.705 96.324,52.788 101.981,53.467 96.324,53.75 94.641,53.842 82.804,53.975 83.566,53.975 96.472,55.636 122.682,55.626 94.615,55.88 123.317,56.261 122.301,56.388 102.235,56.642 102.235,57.658 108.585,58.039 108.585,59.563 88.265,60.325 108.585,60.325 101.935,61.641 135.196,62.647 86.233,63.246 86.995,63.246 135.816,63.319 101.693,63.404 130.683,64.389 131.445,64.77 127.612,65.247 130.683,65.278 128.161,65.667 103.086,65.703 88.715,66.93 89.397,66.92 82.423,67.056 83.312,67.056 104.013,67.183 89.021,67.544 118.872,67.564 118.872,68.326 104.013,68.707 81.28,68.834 82.042,68.834 89.167,70.523 97.536,70.866 103.251,71.12 118.991,72.661 119.882,72.661 122.969,72.661 123.767,72.661 124.822,72.661 104.775,74.803 81.02,75.558 78.71,75.616 114.093,75.759 81.02,76.267 89.535,76.327 93.232,76.343 78.732,76.408 104.775,76.708 86.106,76.962 101.32,77.265 86.868,77.47 86.106,77.851 87.19,78.252 99.981,79.485 101.6,79.502 80.772,79.883 80.772,80.645 101.346,81.28 104.521,82.169 114.681,82.804 118.618,82.804 104.521,83.185 119.253,83.185 82.322,83.47 98.171,83.566 98.933,83.566 114.554,83.693 118.618,83.693 132.588,84.201 132.207,84.836 132.969,84.836 86.995,85.217 87.63,85.217 79.375,85.344 79.883,85.979 78.994,86.106 103.378,87.499 103.378,88.9
  other v2: 107.315,10.16 103.251,10.414 104.013,10.414 99.949,10.795 73.66,11.049 137.414,11.215 99.949,11.557 137.414,12.124 73.66,12.512 105.156,12.7 137.414,13.032 137.414,13.941 73.66,13.975 137.414,14.849 137.414,14.849 73.66,15.438 137.414,15.758 137.414,16.666 73.66,16.9 137.414,17.575 73.66,18.363 137.414,18.483 137.414,19.392 73.66,19.826 137.414,20.3 137.414,21.209 73.66,21.289 137.414,22.118 73.66,22.752 137.414,23.026 73.66,24.215 73.66,24.215 73.66,25.677 73.66,27.14 73.66,28.603 92.456,29.972 73.66,30.066 73.66,31.529 73.66,32.992 73.66,34.455 116.205,34.798 117.623,34.798 119.041,34.798 120.46,34.798 121.878,34.798 123.296,34.798 124.714,34.798 126.132,34.798 127.55,34.798 128.968,34.798 130.387,34.798 131.805,34.798 133.223,34.798 73.66,35.917 73.66,37.38 73.66,38.843 73.66,40.306 73.66,41.769 73.66,43.232 73.66,44.695 73.66,46.157 73.66,47.62 85.598,47.625 85.598,48.371 73.66,49.083 85.598,49.117 85.598,49.863 73.66,50.546 85.598,50.609 85.598,51.356 109.093,51.562 85.598,52.102 85.598,52.848 85.598,53.594 126.844,53.848 127.664,53.848 128.485,53.848 129.306,53.848 130.126,53.848 130.947,53.848 131.767,53.848 132.588,53.848 133.409,53.848 134.229,53.848 135.05,53.848 135.87,53.848 136.691,53.848 137.512,53.848 88.773,57.531 116.205,64.135 116.205,65.049 116.205,65.964 116.205,66.878 93.091,67.056 92.583,67.691 116.205,67.793 116.205,68.707 116.205,69.621 116.205,70.536 116.205,71.45 73.66,71.628 116.205,72.365 73.66,72.469 116.205,73.279 73.66,73.311 73.66,74.152 102.997,74.803 103.886,74.803 73.66,74.993 73.66,75.835 73.66,76.676 73.66,77.518 73.66,78.359 73.66,79.2 73.66,80.042 73.66,80.883 73.66,81.724 73.66,82.566 73.66,83.407 73.66,84.249 73.66,85.09 81.026,93.472 82.858,93.472 84.691,93.472 86.523,93.472 88.356,93.472 90.188,93.472 92.021,93.472 93.853,93.472 95.685,93.472 97.518,93.472 99.35,93.472 101.183,93.472 101.183,93.472 103.015,93.472 104.848,93.472 106.68,93.472 108.512,93.472 110.345,93.472 112.177,93.472 114.01,93.472 115.842,93.472 117.675,93.472 119.507,93.472
  other v3: 121.035,28.88 121.931,28.88 121.035,29.659 121.931,29.659 121.035,30.438 121.931,30.438 121.035,31.216 121.931,31.216 121.035,31.995 121.931,31.995
GNSS_ANT: GNSS1.1 L1.1 U1.2 | length 8.7
  Top Layer w0.254: GNSS1.1@77.164,67.966 84.555,67.966 84.883,68.294 U1.2@84.883,69.12
GNSS_VDD: C6.1 L1.2 U1.98 | length 5.2
  Top Layer w0.254: L1.2@79.647,69.965 81.875,69.965 82.183,70.273 U1.98@82.183,70.87 ; L1.2@79.662,69.98 C6.1@79.662,71.947
GPIO26: R22.1 U1.25 | length 62.3
  Top Layer w0.254: U1.25@94.783,83.62 94.783,84.744 95.358,85.319 99.446,85.319 101.005,86.878 101.005,88.346 102.5,89.841 v1(113.33,89.841) ; R22.1@97.04,64.677 97.04,63.774 97.329,63.485 100.795,63.485 101.922,64.611 v1(104.186,64.611)
  Bottom Layer w0.254: v1(104.186,64.611) 115.756,76.181 115.756,87.415 v1(113.33,89.841)
NET: R3.2 U1.16 | length 8.5
  Top Layer w0.254: U1.16@98.583,74.17 101.945,74.17 104.467,71.648 R3.2@106.005,71.648
NetC1_1: C1.1 C30.2 D1.2 R1.2 U2.4 | length 15.1
  Top Layer w0.6: D1.2@94.104,17.71 C1.1@99.625,17.71 ; 96.158,17.693 R1.2@96.158,13.414 C30.2@98.513,13.414 99.997,13.414 100.223,13.64 U2.4@101.317,13.64
NetC10_1: C10.1 M1.1 U4.5 U4.6 | length 11.8
  Top Layer w0.254: U4.5@124.177,28.539 U4.6@124.177,29.809 125.505,29.809 125.866,29.448 C10.1@127.002,29.448 M1.1@134.595,29.448
NetC10_2: C10.2 M1.2 U4.7 U4.8 | length 11.7
  Top Layer w0.254: U4.8@124.177,32.349 U4.7@124.177,31.079 125.399,31.079 125.768,31.448 C10.2@127.002,31.448 M1.2@134.427,31.448
NetC11_2: C11.2 C12.1 R26.2 U4.4 U7.1 | length 25
  Top Layer w0.254: U7.1@103.069,28.87 103.069,31.484 103.764,32.179 R26.2@105.219,32.179 ; R26.2@105.219,31.651 C12.1@110.367,31.651 ; C12.1@110.367,31.647 110.367,27.766 111.693,26.44 C11.2@118.695,26.44 ; C11.2@118.753,26.498 U4.4@118.753,28.539
NetC16_2: C16.2 R37.1 R38.2 U5.3 U8.1 | length 14.9
  Top Layer w0.254: U5.3@108.485,76.357 108.485,75.161 ; R38.2@109.754,73.735 C16.2@108.006,73.735 108.006,74.682 108.485,75.161 ; R37.1@115.145,78.27 114.971,78.27 113.98,79.261 112.1,79.261 111.936,79.097 U8.1@111.936,78.306 111.936,76.456 110.679,75.199 108.523,75.199 108.485,75.161
NetC17_2: C17.2 R29.1 R33.2 U5.6 U8.5 | length 47.4
  Top Layer w0.254: R29.1@97.255,59.005 97.255,60.113 97.863,60.721 v1(102.953,60.721) ; U5.6@108.485,82.457 v1@108.485,83.937 ; R33.2@112.416,85.499 C17.2@114.421,85.499 ; U8.5@112.586,80.246 v1(112.586,83.852) R33.2@112.586,85.329
  Bottom Layer w0.254: v1(102.953,60.721) 102.953,64.387 113.235,74.669 113.235,83.203 v1(112.586,83.852) v1(108.485,83.852)
NetC18_2: C18.2 R31.2 U5.7 U8.6 | length 11.4
  Top Layer w0.254: U5.7@107.215,82.457 107.215,84.31 C18.2@108.404,85.499 R31.2@110.41,85.499 111.936,83.973 U8.6@111.936,80.246